# Altium PCB Chemist.PcbDoc
Units mm, origin at the board's own origin, x right, y up, seen from the top; angles counter-clockwise.
Board outline 166 x 80 mm, 2 copper layers (Top Layer, Bottom Layer), stack 1.448 mm thick; 25 components, 24 nets, 95 pads, 44 vias.
Unrouted connection lines stored in the file: 12.
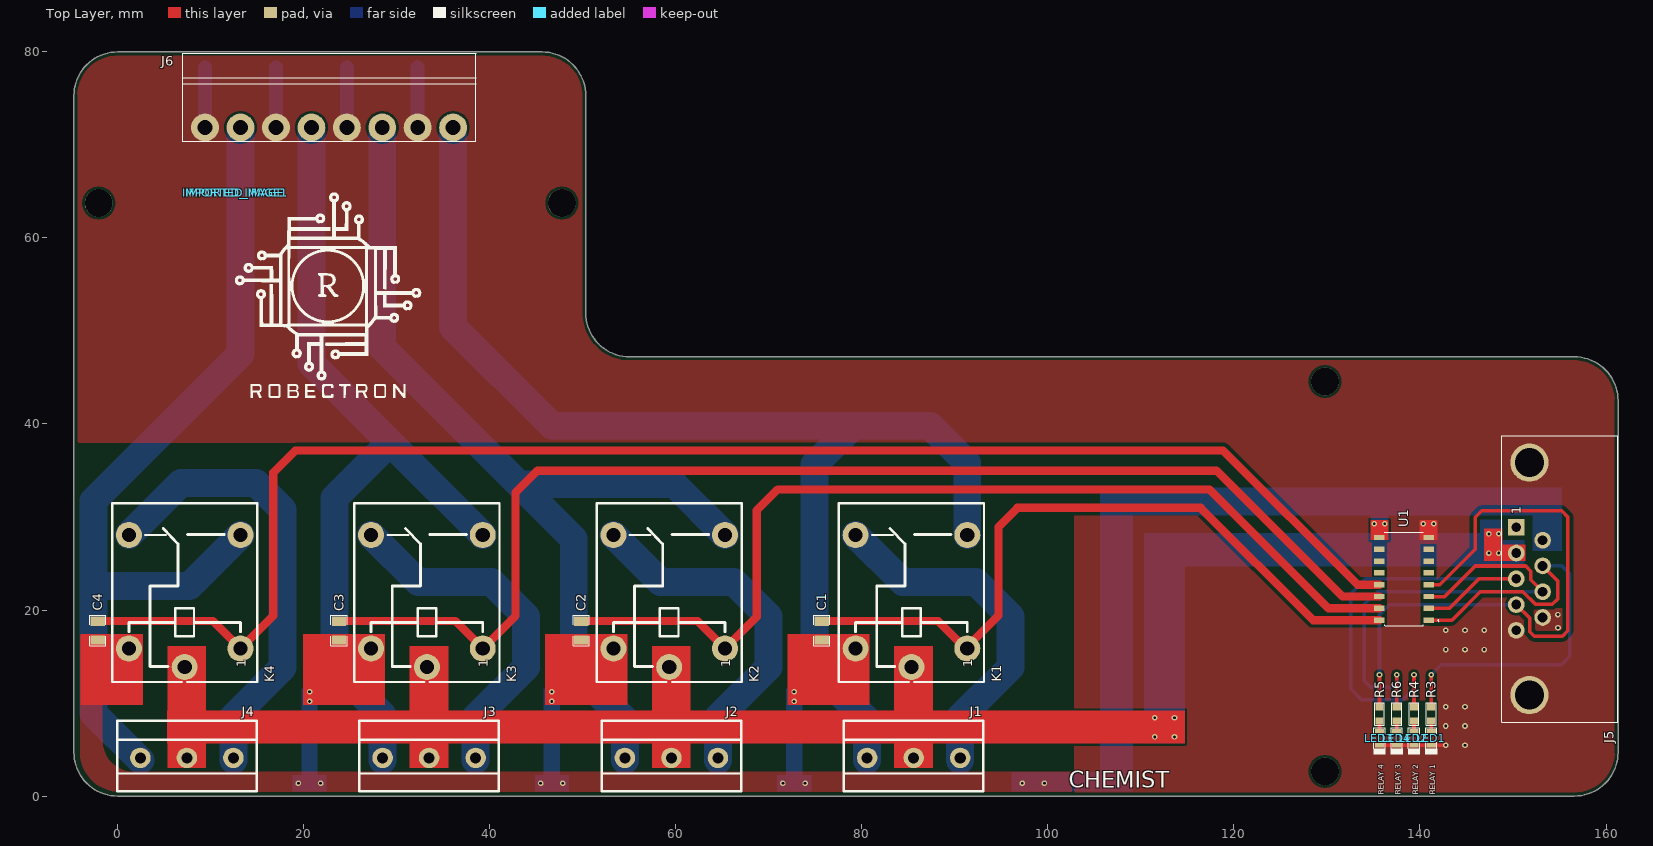
[diagram p0: Top Layer view]
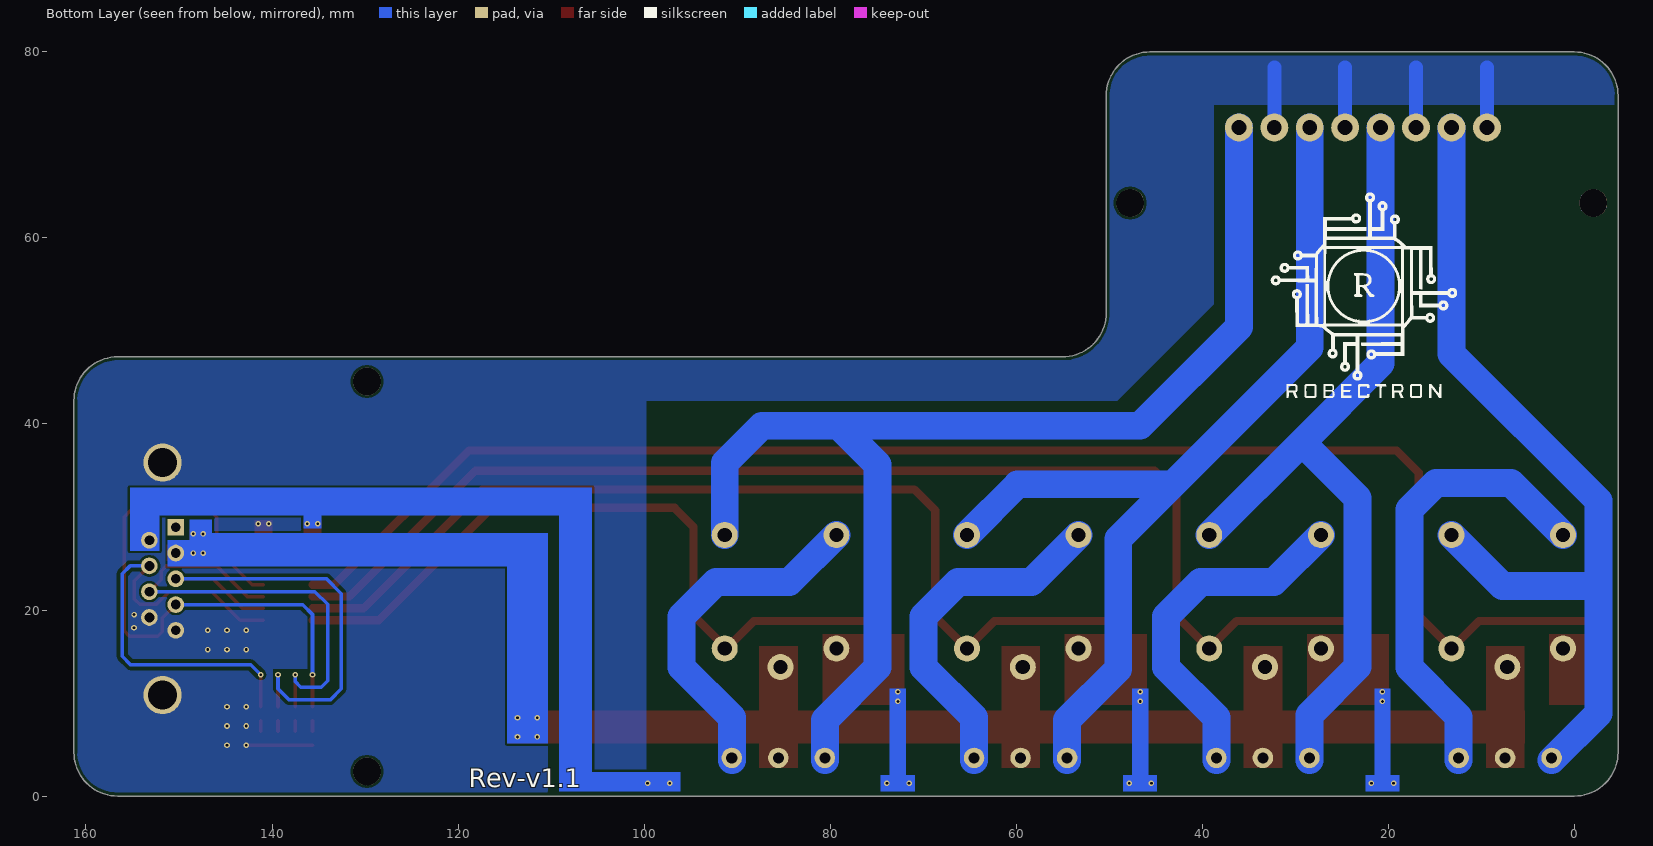
[diagram p1: Bottom Layer view, seen from below]
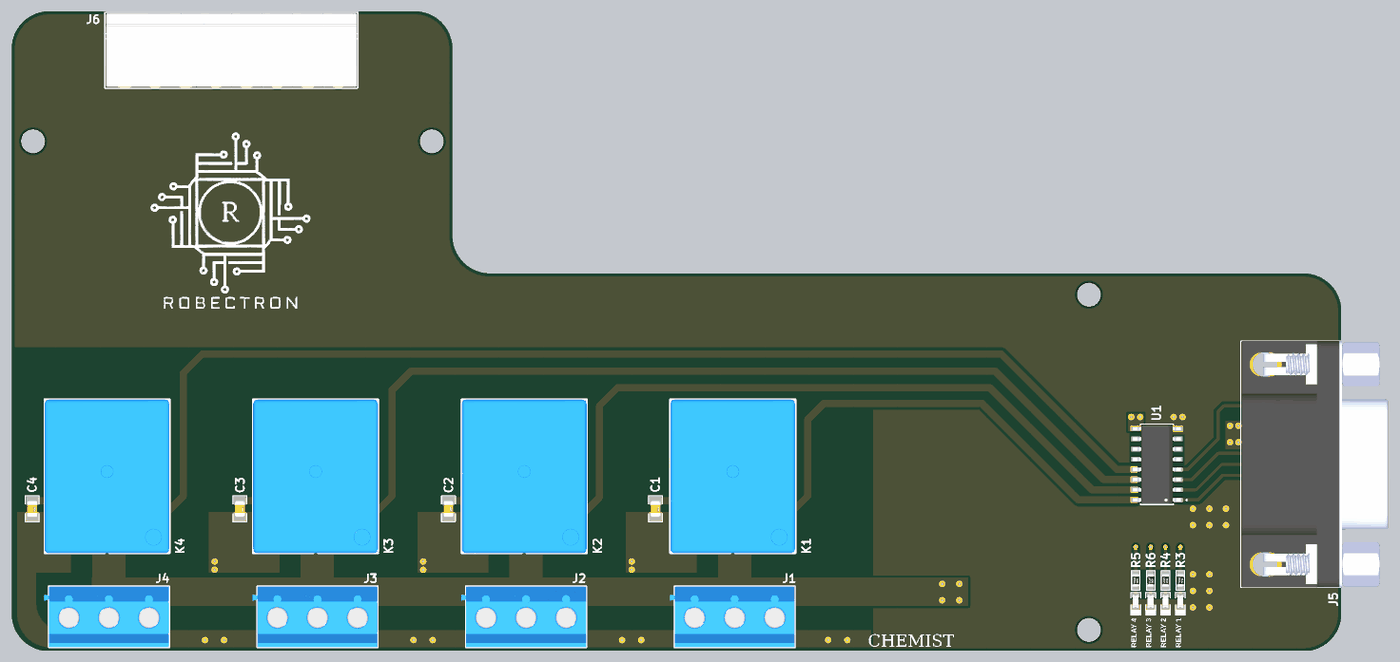
[diagram p2: 3D render of the assembled board from above, using the file's embedded part models]

## Layer stack, top to bottom
Top Solder: solder mask 0.0762, Solder Resist, Dk 3.5
Top Layer: signal copper 0.254
Dielectric 1: core 0.9398, FR-4, Dk 4.8
Bottom Layer: signal copper 0.254
Bottom Solder: solder mask 0.0762, Solder Resist, Dk 3.5

## Board outline
-4.7,4.712 -4.7,75.288 cw(c0.006,75.294) 0,80 45.628,80 cw(c45.622,75.294) 50.328,75.288 50.328,51.934 ccw(c55.034,51.928) 55.028,47.222 156.594,47.222 156.6,47.222 cw(c156.594,42.516) 161.3,42.51 161.3,4.712 cw(c156.594,4.706) 156.6,0 0,0 cw(c0.006,4.706)

## Design rules (kind name [scope] priority, off if disabled: settings)
BoardOutlineClearance [All] p1: gap=0 ignorepadtopadclearanceinfootprint=FALSE except(0.381: Poly-OutlineEdge)
Clearance [All] p1: gap=0.254 ignorepadtopadclearanceinfootprint=FALSE except(0: Arc-Hole Track-Hole SMDPad-Hole THPad-Hole Via-Hole Fill-Hole Poly-Hole Region-Hole Text-Hole; 0.381: Track-Poly)
HoleSize [All] p1: absolutevalues=TRUE maxlimit=3.1 minlimit=0.025 maxpercent=80.000 minpercent=20.000
MinimumSolderMaskSliver [All] p1: minsoldermaskwidth=0
PolygonConnect [All] p1: connectstyle=Direct reliefconductorwidth=0.254 reliefentries=4 polygonreliefangle="45 Angle" airgapwidth=0.254
RoutingVias [All] p1: holewidth=0.3 width=0.6 viastyle="Through Hole" minholewidth=0.3 minwidth=0.6 maxholewidth=0.3 maxwidth=0.6
SilkToSilkClearance [All] p1: silktosilkclearance=0
SilkToSolderMaskClearance [IsPad] p1: minsilkscreentomaskgap=0 clearancetoexposedcopper=TRUE
SolderMaskExpansion [All] p1: expansion=0.102 istentingtop=FALSE
UnRoutedNet [All] p1: checkbadconnections=TRUE
Width [All] p1: maxlimit=3 minlimit=0.254 preferedwidth=0.305 minimp=50.000000 maximp=50.000000 favimp=50.000000
25 further rules are at their usual default settings.

## Classes and differential pairs
component class Chemist-Sheet-v1.1: C1 C2 C3 C4 J1 J2 J3 J4 J5 J6 K1 K2 K3 K4 LED1 LED2 LED3 LED4 R3 R4 R5 R6 U1

## Components (designator, comment, footprint, x,y, rotation, side; value= is the part's Value field where it differs from the comment)
C1 "10uF" Cap-0805 75.693,17.795 r270 top locked
C2 "10uF" Cap-0805 49.836,17.795 r270 top locked
C3 "10uF" Cap-0805 23.801,17.795 r270 top locked
C4 "10uF" Cap-0805 -2.132,17.795 r270 top locked
IMPORTED_IMAGE "Comment" IMPORTED_IMAGE 12.625,64.861 r0 top
IMPORTED_IMAGE1 "Comment" IMPORTED_IMAGE 12.625,64.861 r0 top (schematic designator IMPORTED_IMAGE)
J1 "XY301V-A-5.0-3P" XY301V-A-5.0-3P 85.573,4.104 r180 top locked
J2 "XY301V-A-5.0-3P" XY301V-A-5.0-3P 59.531,4.104 r180 top locked
J3 "XY301V-A-5.0-3P" XY301V-A-5.0-3P 33.488,4.104 r180 top locked
J4 "XY301V-A-5.0-3P" XY301V-A-5.0-3P 7.446,4.104 r180 top locked
J5 "A-DF 09 A/KG-T2S" "A-DF 09 A/KG-T2S" 151.766,23.357 r90 top locked
J6 "DB2ERC-3.81-8P-GN" DB2ERC-3.81-8P-GN 22.734,71.871 r180 top locked
K1 "SRD-05VDC-SL-C" SRD-05VDC-SL-C 85.337,20.967 r90 top locked
K2 "SRD-05VDC-SL-C" SRD-05VDC-SL-C 59.294,20.967 r90 top locked
K3 "SRD-05VDC-SL-C" SRD-05VDC-SL-C 33.252,20.967 r90 top locked
K4 "SRD-05VDC-SL-C" SRD-05VDC-SL-C 7.21,20.967 r90 top locked
LED1 "LTST-C193KRKT-5A" LED-0603 141.212,6.224 r270 top locked
LED2 "LTST-C193KRKT-5A" LED-0603 139.357,6.224 r270 top locked
LED3 "LTST-C193KRKT-5A" LED-0603 135.649,6.224 r270 top locked
LED4 "LTST-C193KRKT-5A" LED-0603 137.503,6.224 r270 top locked
R3 "220R" Res-0603 141.212,8.84 r90 top locked
R4 "220R" Res-0603 139.357,8.84 r90 top locked
R5 "220R" Res-0603 135.649,8.84 r90 top locked
R6 "220R" Res-0603 137.503,8.84 r90 top locked
U1 "ULN2003AIDR" "16-SOIC (0.154\", 3.90mm Width)" 138.283,23.357 r180 top locked

## Footprints (in the part's own frame and the unit in brackets; to place one, negate y for a bottom-side part, rotate by r counter-clockwise, add the part's x,y. Pads: shape width x height; smd on the part's side, far side on the other; paste and mask are expansions set on the pad)
"16-SOIC (0.154\", 3.90mm Width)" [mm]
  rect 1.12x0.58 smd: 1(-2.64,4.445) 2(-2.64,3.175) 3(-2.64,1.905) 4(-2.64,0.635) 5(-2.64,-0.635) 6(-2.64,-1.905) 7(-2.64,-3.175) 8(-2.64,-4.445) 9(2.64,-4.445) 10(2.64,-3.175) 11(2.64,-1.905) 12(2.64,-0.635) 13(2.64,0.635) 14(2.64,1.905) 15(2.64,3.175) 16(2.64,4.445)
  silkscreen extent -3.74,-5.03 2.06,5.03, body extent -3,-4.95 3,4.95, height 1.75
"A-DF 09 A/KG-T2S" [mm]
  rect 1.8x1.8 / inner round 1.8 / far side rect 1.8x1.8 hole 1.05: 1(5.54,1.42)
  round 1.8 hole 1.05: 2(2.77,1.42) 3(0,1.42) 4(-2.77,1.42) 5(-5.54,1.42) 6(4.155,-1.42) 7(1.385,-1.42) 8(-1.385,-1.42) 9(-4.155,-1.42)
  round 4.116 hole 3.1: S1(-12.495,0) S2(12.495,0)
  silkscreen extent -15.41,-9.5 15.41,3, body extent -15.41,-15.4 15.41,2.9, height 12.8
Cap-0805 [mil] "SMD 0805"
  rect 40x60 smd mask+2.76: 1(-40,0) 2(40,0)
  silkscreen extent -64,-34 64,34, body extent -39,-25 39,25, height 30
DB2ERC-3.81-8P-GN [mm]
  round 3 hole 1.6 paste+0 mask+0.051: 1(-13.335,0) 2(-9.525,0) 3(-5.715,0) 4(-1.905,0) 5(1.905,0) 6(5.715,0) 7(9.525,0) 8(13.335,0)
  silkscreen extent -15.8,-8 15.8,1.5, body extent -15.64,-7.89 15.64,1.31, height 7.2
IMPORTED_IMAGE [mm]
  silkscreen extent 0,-22.05 19.99,0.01
LED-0603 [mm]
  rect 0.5x1 smd: 1(-0.75,0) 2(0.75,0)
  silkscreen extent -1.12,-0.66 1.75,0.66, body extent -0.82,-0.37 0.82,0.36, height 0.68
Res-0603 [mil]
  rect 30x35 smd: 1(-30,0) 2(30,0)
  silkscreen extent -48,-21 48,21, body extent -31,-17 31,17, height 18
SRD-05VDC-SL-C [mil]
  round 110 hole 60 paste+0 mask+2: 1(-200.79,-236.22) 2(279.53,-236.2) 3(279.53,236.2) 4(-200.79,236.22) 5(-279.53,0)
  silkscreen extent -342,-307 413,307, body extent -343,-307 413,307, height 642
XY301V-A-5.0-3P [mm]
  round 2.2 hole 1.2 paste+0 mask+0.051: 1(-5,0) 2(0,0) 3(5,0)
  silkscreen extent -7.5,-4 7.5,3.6, body extent -7.5,-4 8.1,3.6, height 10.3

## Part data
C1 C2 C3 C4: library part GRM21BR61H106ME43L, "CAP CER 10UF 50V X5R 0805", LCSC Part Number=C2190942, Manufacturer=Murata, Supplier Part Number 1=490-18664-1-ND, Category="Ceramic Capacitors", Manufacturer Part Number=GRM21BR61H106ME43L, Pricing 1="1=0.44000, 10=0.30700, 50=0.21500, 100=0.18420, 500=0.13818, 1000=0.11668 (USD)", RoHS=Yes, Stock 1=26, Supplier 1=Digi-Key
J1 J2 J3 J4: "1x3P 15A 300V Blue 14~22 Straight 5mm 1.5 1 3 Plugin,P=5mm Screw terminal ROHS", LCSC Part Number=C557652, Manufacturer="Ningbo Xinlaiya Elec", Package=Plugin,P=5mm, ComponentLink1Description=LCSC, ComponentLink1URL=https://www.lcsc.com/product-detail/Screw-terminal_Ningbo-Xinlaiya-Elec-XY301V-A-5-0-3P_C557652.html, Item Type="Screw terminal", Manufacturer Part Number=XY301V-A-5.0-3P
J5: "CONN D-SUB RCPT 9POS R/A SLDR", Manufacturer=Assmann, Supplier Part Number=AE10921-ND, ComponentLink1Description=https://datasheet.ciiva.com/26927/getdatasheetpartid-755627-26927441.pdf?src-supplier=Verical, ComponentLink1URL=https://datasheet.ciiva.com/26927/getdatasheetpartid-755627-26927441.pdf?src-supplier=Verical, Height=12.68mm, Item Type="D-Sub Connectors", Lead Free=5697LeadFree, Manufacturer Part Number="A-DF 09 A/KG-T2S", Number of Contacts=9NUMBER, Pricing="1=0.78, 10=0.661, 25=0.6336, 40=0.62025, 90=0.59322, 270=0.53933, 450=0.4854, 990=0.43147, 2430=0.39102 (USD)", RoHS=Yes, Stock=23990, Supplier=Digikey
J6: "250V 10A 8 Bend -40℃~+105℃ 1 3.81mm 1x8P Green Board Edge/Receptacle-Close Push-Pull,P=3.81mm Pluggable System Terminal Block ROHS", LCSC Part Number=C395716, Manufacturer=DORABO, Package=Push-Pull,P=3.81mm, ComponentLink1Description=LCSC, ComponentLink1URL=https://www.lcsc.com/product-detail/Pluggable-System-Terminal-Block_DORABO-DB2ERC-3-81-8P-GN_C395716.html, Item Type="Terminal Block", Manufacturer Part Number=DB2ERC-3.81-8P-GN
K1 K2 K3 K4: "250V@AC 5V 15A SPDT (1 Form C) Plugin,15.6x19.2mm Power Relays ROHS", LCSC Part Number=C35449, Manufacturer="Ningbo Songle Relay", Package=Plugin,15.6x19.2mm, ComponentLink1Description=LCSC, ComponentLink1URL=https://www.lcsc.com/product-detail/Power-Relays_Ningbo-Songle-Relay-SRD-05VDC-SL-C_C35449.html, Item Type=Relays, Manufacturer Part Number=SRD-05VDC-SL-C
LED1 LED2 LED3 LED4: "LED RED CLEAR CHIP SMD", Case Code (Imperial)=0603, Case Code (Metric)=1608, Color=Red, Forward Current=30mA, Forward Voltage=2.3V, Lens Color=Colorless, Manufacturer="Vishay Lite-On", Max Operating Temperature=85°C, Min Operating Temperature=-55°C, Package Quantity=3000, Power Dissipation=75mW, Reverse Voltage=5V, Supplier Part Number=160-1830-1-ND, Test Current=5mA, Case/Package=0603, ComponentLink1Description=https://datasheet.ciiva.com/11775/0900766b80dc0551-11775612.pdf?src-supplier=Rs, ComponentLink1URL=https://datasheet.ciiva.com/11775/0900766b80dc0551-11775612.pdf?src-supplier=Rs, ComponentLink2Description=https://datasheet.ciiva.com/4689/100-ltst-c193krkt-5a-61179-4689123.pdf?src-supplier=Mouser, ComponentLink2URL=https://datasheet.ciiva.com/4689/100-ltst-c193krkt-5a-61179-4689123.pdf?src-supplier=Mouser, ComponentLink3Description=https://datasheet.ciiva.com/16210/ltst-c193krkt-5a-16210822.pdf?src-supplier=Future+Electronics, ComponentLink3URL=https://datasheet.ciiva.com/16210/ltst-c193krkt-5a-16210822.pdf?src-supplier=Future+Electronics, ComponentLink4Description=https://datasheet.ciiva.com/2110/s-110-ltst-c193krkt-5a-2110272.pdf?src-supplier=Digikey, ComponentLink4URL=https://datasheet.ciiva.com/2110/s-110-ltst-c193krkt-5a-2110272.pdf?src-supplier=Digikey, Depth=0.8mm, Dominant Wavelength=631nm, Height=0.45mm, Illumination Color=Red, Item Type=LEDs, Lead Free="Lead Free", Length=1.6mm, Lens Size=0.8mm, Lens Style=Flat,Diffused,Colorless,Rectangular,Clear, Lens Transparency=Clear, Luminous Intensity=45mcd, Manufacturer Part Number=LTST-C193KRKT-5A, Mounting Technology="Surface Mount", Number of Elements=1, Number of LEDs=1, Packaging="Tape and Reel", Pins=2, Pricing="1=0.39, 10=0.211, 100=0.0981, 500=0.0906, 1000=0.07097, 2000=0.06946 (USD)", Radiation Hardening=No, RoHS=Yes, RoHS Compliant=Yes, Series=-, Stock=241564, Supplier=Digikey, Viewing Angle=130°, Wavelength=631nm, Width=0.8mm
R3 R4 R5 R6: library part CRCW0603220RFKEA, "RES SMD 220 OHM 1% 1/10W 0603", Case Code (Imperial)=0603, Case Code (Metric)=1608, LCSC Part Number=C844757, Max Operating Temperature=155°C, Max Power Dissipation=100mW, Min Operating Temperature=-55°C, Package Quantity=5000, Ratings=AEC-Q200, Resistance Tolerance=1%, Resistor Type="Thick Film", Supplier Part Number=71-CRCW0603-220-E3, Temperature Coefficient=100ppm/°C, Voltage Rating=75V, Case/Package=0603, Category="Chip SMD Resistors", ComponentLink1Description=LCSC, ComponentLink2Description=https://datasheet.ciiva.com/11810/0900766b80d98afc-11810631.pdf?src-supplier=Rs, ComponentLink2URL=https://datasheet.ciiva.com/11810/0900766b80d98afc-11810631.pdf?src-supplier=Rs, ComponentLink3Description=https://datasheet.ciiva.com/8339/dcrcwe3-8339957.pdf?src-supplier=Avnet, ComponentLink3URL=https://datasheet.ciiva.com/8339/dcrcwe3-8339957.pdf?src-supplier=Avnet, ComponentLink4Description=https://datasheet.ciiva.com/16222/dcrcwe3-16222278.pdf?src-supplier=Future+Electronics, ComponentLink4URL=https://datasheet.ciiva.com/16222/dcrcwe3-16222278.pdf?src-supplier=Future+Electronics, ComponentLink5Description=https://datasheet.ciiva.com/7777/1697337-7777301.pdf?src-supplier=Element14, ComponentLink5URL=https://datasheet.ciiva.com/7777/1697337-7777301.pdf?src-supplier=Element14, ComponentLink6Description=https://datasheet.ciiva.com/16763/70201119-16763287.pdf?src-supplier=Allied+Electronics, ComponentLink6URL=https://datasheet.ciiva.com/16763/70201119-16763287.pdf?src-supplier=Allied+Electronics, ComponentLink7Description=https://datasheet.ciiva.com/2466/dcrcwe3-2466464.pdf?src-supplier=Digi-Key, ComponentLink7URL=https://datasheet.ciiva.com/2466/dcrcwe3-2466464.pdf?src-supplier=Digi-Key, ComponentLink8Description=https://datasheet.ciiva.com/2466/dcrcwe3-2466465.pdf?src-supplier=Digi-Key, ComponentLink8URL=https://datasheet.ciiva.com/2466/dcrcwe3-2466465.pdf?src-supplier=Digi-Key, ComponentLink9Description=https://datasheet.ciiva.com/2466/dcrcwe3-2466466.pdf?src-supplier=Digi-Key, ComponentLink9URL=https://datasheet.ciiva.com/2466/dcrcwe3-2466466.pdf?src-supplier=Digi-Key, ComponentLink10Description=https://datasheet.ciiva.com/7777/1720486-7777551.pdf?src-supplier=Element14, ComponentLink10URL=https://datasheet.ciiva.com/7777/1720486-7777551.pdf?src-supplier=Element14, ComponentLink11Description=https://datasheet.ciiva.com/26316/fld-crcw-e3-data-en-26316574.pdf?src-supplier=Distrelec, ComponentLink11URL=https://datasheet.ciiva.com/26316/fld-crcw-e3-data-en-26316574.pdf?src-supplier=Distrelec, ComponentLink12Description=https://datasheet.ciiva.com/5550/dcrcwe3-109170-5550773.pdf?src-supplier=Mouser, ComponentLink12URL=https://datasheet.ciiva.com/5550/dcrcwe3-109170-5550773.pdf?src-supplier=Mouser, ComponentLink13Description=https://datasheet.ciiva.com/15159/getdatasheetpartid-45816-15159565.pdf?src-supplier=Verical, ComponentLink13URL=https://datasheet.ciiva.com/15159/getdatasheetpartid-45816-15159565.pdf?src-supplier=Verical, Construction=Rectangular, Contact Plating=Tin, Depth=0.85mm, Features="Automotive AEC-Q200", Height=0.45mm, Item Type=Resistor, Lead Free="Lead Free", Length=1.55mm, Military Standard=Not, Number of Terminations=2, Packaging="Tape and Reel", Power Rating=100mW, Pricing="1=0.1, 10=0.017, 50=0.017, 100=0.01, 1000=0.008, 10000=0.004 (USD)", Radiation Hardening=No, Reach SVHC Compliant=Unknown, RoHS=Yes, RoHS Compliant=Yes, Series=CRCW, Stock=40706, Supplier=Mouser, Technology="THICK FILM", Termination=SMD/SMT, Tolerance=1%, Voltage Rating (DC)=75V, Weight=7.1E-05oz, Width=0.85mm
U1: "IC PWR RELAY 7NPN 1:1 16SOIC", Manufacturer="Texas Instruments", Supplier Part Number=595-ULN2003AIDR, ComponentLink1Description=https://datasheet.ciiva.com/15139/getdatasheetpartid-47948-15139878.pdf?src-supplier=Verical, ComponentLink1URL=https://datasheet.ciiva.com/15139/getdatasheetpartid-47948-15139878.pdf?src-supplier=Verical, ComponentLink2Description=https://datasheet.ciiva.com/14424/ulq2003a-14424030.pdf?src-supplier=Avnet, ComponentLink2URL=https://datasheet.ciiva.com/14424/ulq2003a-14424030.pdf?src-supplier=Avnet, ComponentLink3Description=https://datasheet.ciiva.com/1700/uln2003ai-1700820.pdf?src-supplier=Digikey, ComponentLink3URL=https://datasheet.ciiva.com/1700/uln2003ai-1700820.pdf?src-supplier=Digikey, ComponentLink4Description=https://datasheet.ciiva.com/1700/uln2003ai-1700821.pdf?src-supplier=Digikey, ComponentLink4URL=https://datasheet.ciiva.com/1700/uln2003ai-1700821.pdf?src-supplier=Digikey, ComponentLink5Description=https://datasheet.ciiva.com/1700/uln2003ai-1700822.pdf?src-supplier=Digikey, ComponentLink5URL=https://datasheet.ciiva.com/1700/uln2003ai-1700822.pdf?src-supplier=Digikey, Item Type=IC, Manufacturer Part Number=ULN2003AIDR, Pricing="1=0.66, 10=0.589, 50=0.589, 100=0.402, 1000=0.285, 10000=0.232 (USD)", RoHS=Yes, Stock=2012, Supplier=Mouser

## Free pads (board coordinates)
  round 3 hole 3 unplated paste+0: ""(-2.031,63.743) ""(47.753,63.743) ""(129.795,2.656) ""(129.795,44.566)

## Via types
v1: diameter 0.6, hole 0.3, Top Layer to Bottom Layer, 44 vias

## Nets (pads, with @x,y where several pads share a name; then routed paths per layer and width w, separated by ;. In a path a pad name is that pad's centre, name@x,y a point inside that pad or via, vN(x,y) a via of type N, cw(c..) or ccw(c..) an arc to the next point about the centre after c; other vN are vias at no path point)
5V_EXT: C1.2 C2.2 C3.2 C4.2 J5.6 K1.4 K2.4 K3.4 K4.4 U1.9
  other v1: 19.432,1.386 21.82,1.386 45.474,1.386 47.862,1.386 71.517,1.386 73.904,1.386 97.242,1.386 99.629,1.386 20.637,10.175 46.679,10.175 72.721,10.175 20.637,11.216 46.679,11.216 72.721,11.216 135.083,29.275 136.203,29.275
12V_EXT: J1.2 J2.2 J3.2 J4.2 J5.2 K1.5 K2.5 K3.5 K4.5
  other v1: 111.482,6.365 113.615,6.365 111.482,8.422 113.615,8.422 147.416,26.119 148.464,26.127 147.416,28.183 148.464,28.191
GND: J5.5 J5.9 J5.S1 J5.S2 J6.2 J6.4 J6.6 J6.8 LED1.2 LED2.2 LED3.2 LED4.2 U1.8 | length 33.1
  Top Layer w0.381: LED3.2 LED1.2 ; LED1.2 v1(142.775,5.474)
  Bottom Layer w0.762: 32.158,78.424 32.259,78.323
  Bottom Layer w1.5: J6.8 9.399,78.323 ; J6.6 17.019,78.323 ; J6.4 24.639,78.323 ; J6.2 32.259,78.323
  other v1: 144.839,5.474 142.775,7.538 144.839,7.538 142.775,9.602 144.839,9.602 142.775,15.753 144.839,15.753 146.903,15.753 142.775,17.817 144.839,17.817 146.903,17.817 154.84,18.099 154.834,19.512 140.363,29.275 141.483,29.275
IN1: J5.7 R3.2 U1.1 | length 51.5
  Top Layer w0.381: U1.1 143.435,18.912 146.49,21.967 151.064,21.967 152.418,20.614 154.221,20.614 154.834,21.227 154.834,23.095 J5.7 ; R3.2 v1(141.212,13.045)
  Bottom Layer w0.381: v1(141.212,13.045) 142.304,14.137 155.215,14.137 156.11,15.032 156.11,23.893 155.26,24.742 J5.7
IN2: J5.3 R4.2 U1.2 | length 52.2
  Top Layer w0.381: R4.2 v1(139.357,13.045) ; U1.2 143.177,20.182 146.352,23.357 J5.3
  Bottom Layer w0.381: v1(139.357,13.045) 139.357,11.549 138.144,10.336 133.757,10.336 132.55,11.542 132.55,21.76 134.147,23.357 J5.3
IN3: J5.8 R6.2 U1.3 | length 51.4
  Top Layer w0.381: R6.2 v1(137.503,13.045) ; U1.3 142.651,21.452 145.932,24.734 151.362,24.734 151.915,24.18 151.915,23.243 J5.8
  Bottom Layer w0.381: v1(137.503,13.045) 137.503,12.321 136.899,11.716 134.715,11.716 134.029,12.402 134.029,20.611 135.39,21.972 J5.8
IN4: J5.4 R5.2 U1.4 | length 65.9
  Top Layer w0.381: R5.2 v1(135.649,13.045) ; U1.4 142.13,22.722 145.932,26.524 145.932,29.971 146.633,30.672 155.226,30.672 155.896,30.002 155.896,17.76 155.318,17.181 152.286,17.181 151.79,17.677 151.79,19.144 J5.4
  Bottom Layer w0.381: v1(135.649,13.045) 135.649,19.522 136.715,20.587 J5.4
NC1: J1.1 K1.3 | length 38
  Bottom Layer w3: K1.3 84.402,23.002 92.294,23.002 95.992,19.304 95.992,13.847 90.573,8.428 J1.1@90.573,3.85
NC2: J2.1 K2.3 | length 38
  Bottom Layer w3: K2.3 58.36,23.002 66.252,23.002 69.95,19.304 69.95,13.847 64.531,8.428 J2.1@64.531,3.85
NC3: J3.1 K3.3 | length 38
  Bottom Layer w3: K3.3 32.318,23.002 40.209,23.002 43.907,19.304 43.907,13.847 38.488,8.428 J3.1@38.488,3.85
NC4: J4.1 K4.3 | length 49.2
  Bottom Layer w3: K4.3 6.808,33.664 14.878,33.664 17.743,30.799 17.743,13.821 12.446,8.524 J4.1@12.446,3.85
NetLED1_1: LED1.1 R3.1 | length 1.1
  Top Layer w0.381: LED1.1 R3.1
NetLED2_1: LED2.1 R4.1 | length 1.1
  Top Layer w0.381: LED2.1 R4.1
NetLED3_1: LED3.1 R5.1 | length 1.1
  Top Layer w0.381: LED3.1 R5.1
NetLED4_1: LED4.1 R6.1 | length 1.1
  Top Layer w0.381: LED4.1 R6.1
NO1: J1.3 J6.1 K1.2 | length 130.5
  Bottom Layer w3: J6.1 36.069,50.434 46.689,39.814 79.103,39.814 ; J1.3@80.573,3.85 80.573,8.19 74.917,13.847 74.917,35.628 79.103,39.814 ; K1.2 91.336,35.807 87.329,39.814 79.103,39.814
NO2: J2.3 J6.3 K2.2 | length 103.2
  Bottom Layer w3: J6.3 28.449,48.232 43.163,33.518 ; J2.3@54.531,3.85 54.531,8.188 49.036,13.683 49.036,27.645 43.163,33.518 ; K2.2 59.843,33.518 43.163,33.518
NO3: J3.3 J6.5 K3.2 | length 90.2
  Bottom Layer w3: J6.5 20.829,46.489 29.296,38.022 ; J3.3@28.488,3.85 28.488,8.721 23.31,13.9 23.31,32.036 29.296,38.022 ; K3.2 29.296,38.022
NO4: J4.3 J6.7 K4.2 | length 94.7
  Bottom Layer w3: J4.3@2.446,3.85 -2.575,8.872 -2.575,22.595 ; K4.2 7.738,22.595 -2.575,22.595 ; J6.7 13.209,48.123 13.209,47.538 -2.575,31.754 -2.575,22.595
"RELAY 1": C1.1 K1.1 U1.16 | length 78
  Top Layer w0.889: C1.1 88.207,18.811 K1.1@91.151,15.867 ; K1.1@91.151,15.867 94.688,19.403 94.688,28.95 96.722,30.984 116.428,30.984 128.5,18.912 U1.16
"RELAY 2": C2.1 K2.1 U1.15 | length 106.1
  Top Layer w0.889: C2.1 62.35,18.811 K2.1 ; K2.1 68.703,19.276 68.703,30.704 70.955,32.955 117.395,32.955 130.168,20.182 U1.15
"RELAY 3": C3.1 K3.1 U1.14 | length 134.2
  Top Layer w0.889: C3.1@23.91,18.811 36.308,18.811 K3.1 42.768,19.383 42.768,32.627 45.126,34.985 118.132,34.985 131.665,21.452 U1.14
"RELAY 4": C4.1 K4.1 U1.13 | length 162.8
  Top Layer w0.889: C4.1 10.266,18.811 K4.1 16.734,19.391 16.734,34.791 19.104,37.162 118.836,37.162 133.275,22.722 U1.13
VCC_5V: J5.1
pads on no net: U1.5 U1.6 U1.7 U1.10 U1.11 U1.12

## Polygon pours and split planes (outlines as drawn)
GND on Bottom Layer "NONET_L-01_P-001" (solid, remove dead copper, pour order 2): -4.7,4.712 -4.7,75.288 cw(c0.006,75.294) 0,80 45.628,80 cw(c45.622,75.294) 50.328,75.288 50.328,51.934 ccw(c55.034,51.928) 55.028,47.222 156.594,47.222 156.6,47.222 cw(c156.594,42.516) 161.3,42.51 161.3,4.712 cw(c156.594,4.706) 156.6,0 0,0 cw(c0.006,4.706)
GND on Top Layer "NONET_L-01_P-001" (solid, remove dead copper, pour order 3): -4.7,4.712 -4.7,75.288 cw(c0.006,75.294) 0,80 45.628,80 cw(c45.622,75.294) 50.328,75.288 50.328,51.934 ccw(c55.034,51.928) 55.028,47.222 156.594,47.222 156.6,47.222 cw(c156.594,42.516) 161.3,42.51 161.3,4.712 cw(c156.594,4.706) 156.6,0 0,0 cw(c0.006,4.706)
5V_EXT on Top Layer "NONET_L-01_P-001" (solid, pour order 1): -4.012,4.448 -4.012,17.287 -1.624,17.287 -1.624,6.418 ccw(c6.694,6.242) -1.587,5.437 ccw(c1.724,5.957) 1.785,2.605 102.592,2.605 102.592,0.48 0.203,0.48 cw(c0.203,4.703)

## Other copper
Top Layer:
  rectangle net 12V_EXT: 5.339,3.004 9.51,16.144
  rectangle net 12V_EXT: 31.381,3.004 35.553,16.144
  rectangle net 12V_EXT: 57.423,3.004 61.595,16.144
  rectangle net 5V_EXT: 134.675,27.512 136.631,29.682
  rectangle net GND: 139.955,27.512 141.911,29.682
  rectangle net 5V_EXT: -4.012,9.797 2.707,17.414
  rectangle net 5V_EXT: 19.915,9.797 28.749,17.414
  rectangle net 5V_EXT: 71.999,9.797 80.833,17.414
  rectangle net 5V_EXT: 45.957,9.797 54.791,17.414
  rectangle net 5V_EXT: 25.699,14.413 28.749,17.414
  rectangle net 5V_EXT: 77.783,14.413 80.833,17.414
  rectangle net 12V_EXT: 5.329,5.633 114.738,9.206
  rectangle net 12V_EXT: 83.466,3.004 87.637,16.144
  rectangle net 12V_EXT: 146.871,25.276 148.896,28.789
  rectangle net 12V_EXT: 146.871,25.276 151.362,27.062
  pour cut-out: 19.104,37.998 -4.266,37.998 -4.266,35.321 19.104,35.321
  pour cut-out: 102.846,2.605 102.846,30.266 100.788,30.266 100.788,2.605
  pour cut-out: 76.709,17.43 76.709,18.299 74.677,18.299 74.677,17.43
  pour cut-out: 50.852,17.43 50.852,18.299 48.82,18.299 48.82,17.43
  pour cut-out: -1.116,17.43 -1.116,18.299 -3.148,18.299 -3.148,17.43
  pour cut-out: 24.817,17.43 24.817,18.299 22.785,18.299 22.785,17.43
  pour cut-out: 134.95,6.47 141.91,6.47 141.91,10.237 134.95,10.237
  pour cut-out: 151.36,18.963 152.228,18.963 152.228,20.584 151.36,20.584
  pour cut-out: 154.086,20.173 155.574,20.173 155.574,21.794 154.086,21.794
  pour cut-out: 149.861,27.98 149.861,27.112 151.482,27.112 151.482,27.98
  pour cut-out: 149.887,30.469 149.887,29.601 151.507,29.601 151.507,30.469
  pour cut-out: 134.824,27.523 134.824,26.655 136.457,26.655 136.457,27.523
  pour cut-out: 140.109,23.702 140.109,22.834 141.73,22.834 141.73,23.702
  pour cut-out: 140.109,24.972 140.109,24.104 141.73,24.104 141.73,24.972
  pour cut-out: 140.109,26.242 140.109,25.374 141.73,25.374 141.73,26.242
  pour cut-out: 134.85,19.065 134.85,18.196 136.471,18.196 136.471,19.065
  pour cut-out: 134.829,26.242 134.829,25.374 136.45,25.374 136.45,26.242
  pour cut-out: 134.829,24.983 134.829,24.115 136.45,24.115 136.45,24.983
  pour cut-out: 135.688,23.713 135.688,22.845 136.45,22.845 136.45,23.713
  pour cut-out: 135.688,22.443 135.688,21.575 136.45,21.575 136.45,22.443
  pour cut-out: 135.713,21.173 135.713,20.305 136.475,20.305 136.475,21.173
  pour cut-out: 135.713,19.903 135.713,19.035 136.475,19.035 136.475,19.903
  pour cut-out: 140.109,19.892 140.109,19.024 140.871,19.024 140.871,19.892
  pour cut-out: 140.109,21.162 140.109,20.294 140.871,20.294 140.871,21.162
  pour cut-out: 140.109,26.242 140.109,25.374 140.871,25.374 140.871,26.242
  pour cut-out: 140.109,24.972 140.109,24.104 140.871,24.104 140.871,24.972
  pour cut-out: 140.109,23.702 140.109,22.834 140.871,22.834 140.871,23.702
  pour cut-out: 140.109,22.432 140.109,21.564 140.871,21.564 140.871,22.432
  pour cut-out: 146.385,29.784 146.385,28.915 147.147,28.915 147.147,29.784
Bottom Layer:
  rectangle net 5V_EXT: 96.065,0.485 109.166,2.605
  rectangle net 12V_EXT: 110.339,24.698 148.896,28.285
  rectangle net 12V_EXT: 110.339,5.633 114.738,28.285
  rectangle net 12V_EXT: 146.458,24.698 148.896,29.733
  rectangle net 12V_EXT: 146.458,24.698 151.246,27.512
  rectangle net 5V_EXT: 105.589,0.485 109.166,33.169
  rectangle net 5V_EXT: 19.754,0.489 21.513,11.572
  rectangle net 5V_EXT: 45.796,0.489 47.555,11.572
  rectangle net 5V_EXT: 134.675,28.74 136.628,32.273
  rectangle net 5V_EXT: 105.589,30.156 155.281,33.169
  rectangle net 5V_EXT: 152.077,26.354 155.281,33.169
  rectangle net 5V_EXT: 70.907,0.489 74.565,2.25
  rectangle net 5V_EXT: 44.865,0.489 48.522,2.25
  rectangle net 5V_EXT: 18.823,0.489 22.48,2.25
  rectangle net 5V_EXT: 71.839,0.489 73.597,11.572
  pour cut-out: 109.166,0.485 110.339,0.485 110.339,30.15 109.166,30.15
  pour cut-out: 131.967,11.542 139.94,11.542 139.94,13.665 131.967,13.665
  pour cut-out: -4.7,74.335 -4.7,4.7 0,0 99.747,0 99.747,42.51 49.149,42.51 38.762,52.897 38.762,74.335

## Silkscreen, mask and mechanical layers (free items; w line width, h text height)
Top Overlay:
  text "CHEMIST" at 102.247,0.294 h3
  text "RELAY 4" at 136.309,0.128 h1.02 r90
  text "RELAY 3" at 138.164,0.128 h1.02 r90
  text "RELAY 2" at 140.018,0.128 h1.02 r90
  text "RELAY 1" at 141.872,0.128 h1.02 r90
Bottom Overlay:
  text "Rev-v1.1" at 118.834,0.931 h2
Board Outline:
  lines w0.254: 156.594,47.222 55.028,47.222 cw(c55.034,51.928) 50.328,51.934 50.328,75.288 ccw(c45.622,75.294) 45.628,80 0,80 ccw(c0.006,75.294) -4.7,75.288 -4.7,4.712 ccw(c0.006,4.706) 0,0 156.6,0 ccw(c156.594,4.706) 161.3,4.712 161.3,42.51 ccw(c156.594,42.516) 156.6,47.222
Fabrication:
  drawing of 191 lines, arcs and shapes, not listed
  text "Layer" at 223.855,84.43 h1.52
  text "Name" at 234.267,84.43 h1.52
  text "Material" at 257.882,84.43 h1.52
  text "Thickness" at 279.721,84.43 h1.52
  text "Constant" at 296.226,84.43 h1.52
  text "Board Layer Stack" at 310.701,84.43 h1.52
  text "Top Overlay" at 234.267,81.382 h1.52
  text "Top Solder" at 234.267,78.334 h1.52
  text "Solder Resist" at 257.882,78.334 h1.52
  text "3.00mil" at 279.721,78.334 h1.52
  text "3.5" at 296.226,78.334 h1.52
  text "1" at 223.855,75.286 h1.52
  text "Top Layer" at 234.267,75.286 h1.52
  text "10.00mil" at 279.721,75.286 h1.52
  text "Dielectric 1" at 234.267,72.238 h1.52
  text "FR-4" at 257.882,72.238 h1.52
  text "37.00mil" at 279.721,72.238 h1.52
  text "4.8" at 296.226,72.238 h1.52
  text "2" at 223.855,69.19 h1.52
  text "Bottom Layer" at 234.267,69.19 h1.52
  text "10.00mil" at 279.721,69.19 h1.52
  text "Bottom Solder" at 234.267,66.142 h1.52
  text "Solder Resist" at 257.882,66.142 h1.52
  text "3.00mil" at 279.721,66.142 h1.52
  text "3.5" at 296.226,66.142 h1.52
  text "Bottom Overlay" at 234.267,63.094 h1.52
  text "Total board thickness:" at 223.855,60.046 h1.52
  text "63.00mil" at 279.721,60.046 h1.52
Drill Drawing:
  circle w0.254: c-1.511,99.881 r0.847
  lines w0.254: -2.358,95.225 -2.358,95.648 -1.935,96.071 -2.358,96.495 -2.358,96.918 -1.935,96.918 -1.511,96.495 -1.088,96.918 -0.665,96.918 -0.665,96.495 -1.088,96.071 -0.665,95.648 -0.665,95.225 -1.088,95.225 -1.511,95.648 -1.935,95.225 -2.358,95.225 ; -2.358,102.845 -0.665,102.845 -0.665,104.538 -2.358,104.538 -2.358,102.845 ; -2.358,106.655 -1.511,107.078 -0.665,106.655 -1.088,107.501 -0.665,108.348 -1.511,107.925 -2.358,108.348 -1.935,107.501 -2.358,106.655 ; -2.358,112.158 -0.665,112.158 -1.511,110.465 -2.358,112.158 ; -2.358,114.698 -1.935,114.698 -1.935,114.275 -1.088,114.275 -1.088,114.698 -0.665,114.698 -0.665,115.545 -1.088,115.545 -1.088,115.968 -1.935,115.968 -1.935,115.545 -2.358,115.545 -2.358,114.698 ; -2.358,118.508 -1.935,118.508 -1.511,118.085 -1.088,118.508 -0.665,118.508 -1.088,118.931 -0.665,119.355 -1.088,119.355 -1.511,119.778 -1.935,119.355 -2.358,119.355 -1.935,118.931 -2.358,118.508
  lines w0.381: -3.877,94.082 337.352,94.082 ; -3.877,120.752 337.352,120.752 ; 10.115,90.272 10.115,124.562 ; 23.828,90.272 23.828,124.562 ; 52.775,90.272 52.775,124.562 ; 65.625,90.272 65.625,124.562 ; 84.263,90.272 84.263,124.562 ; 122.352,90.272 122.352,124.562 ; 137.334,90.272 137.334,124.562 ; 156.277,90.272 156.277,124.562 ; 190.303,90.272 190.303,124.562 ; 211.989,90.272 211.989,124.562 ; 245.862,90.272 245.862,124.562 ; 279.736,90.272 279.736,124.562 ; 301.726,90.272 301.726,124.562 ; -3.877,90.272 337.352,90.272 337.352,124.562 -3.877,124.562 -3.877,90.272
  text "Symbol" at -1.591,121.895 h1.83
  text "Count" at 11.258,121.895 h1.83
  text "Hole Size" at 24.971,121.895 h1.83
  text "Plated" at 53.918,121.895 h1.83
  text "Hole Type" at 66.768,121.895 h1.83
  text "Drill Layer Pair" at 85.406,121.895 h1.83
  text "Via/Pad" at 123.495,121.895 h1.83
  text "Pad Shape" at 138.477,121.895 h1.83
  text "Template" at 157.42,121.895 h1.83
  text "Description" at 191.446,121.895 h1.83
  text "Hole Tolerance (+)" at 213.132,121.895 h1.83
  text "Hole Tolerance (-)" at 247.005,121.895 h1.83
  text "Hole Length" at 280.879,121.895 h1.83
  text "Routed Path Length" at 302.869,121.895 h1.83
  text "2" at 11.258,118.085 h1.52
  text "122.05mil (3.100mm)" at 24.971,118.085 h1.52
  text "PTH" at 53.918,118.085 h1.52
  text "Round" at 66.768,118.085 h1.52
  text "Top Layer - Bottom Layer" at 85.406,118.085 h1.52
  text "Pad" at 123.495,118.085 h1.52
  text "Rounded" at 138.477,118.085 h1.52
  text "c412h310" at 157.42,118.085 h1.52
  text "-" at 280.879,118.085 h1.52
  text "-" at 302.869,118.085 h1.52
  text "4" at 11.258,114.275 h1.52
  text "118.11mil (3.000mm)" at 24.971,114.275 h1.52
  text "NPTH" at 53.918,114.275 h1.52
  text "Round" at 66.768,114.275 h1.52
  text "Top Layer - Bottom Layer" at 85.406,114.275 h1.52
  text "Pad" at 123.495,114.275 h1.52
  text "Rounded" at 138.477,114.275 h1.52
  text "c300hn300p300" at 157.42,114.275 h1.52
  text "-" at 280.879,114.275 h1.52
  text "-" at 302.869,114.275 h1.52
  text "8" at 11.258,110.465 h1.52
  text "62.99mil (1.600mm)" at 24.971,110.465 h1.52
  text "PTH" at 53.918,110.465 h1.52
  text "Round" at 66.768,110.465 h1.52
  text "Top Layer - Bottom Layer" at 85.406,110.465 h1.52
  text "Pad" at 123.495,110.465 h1.52
  text "Rounded" at 138.477,110.465 h1.52
  text "c300h160m305mx305p300" at 157.42,110.465 h1.52
  text "-" at 280.879,110.465 h1.52
  text "-" at 302.869,110.465 h1.52
  text "9" at 11.258,106.655 h1.52
  text "41.34mil (1.050mm)" at 24.971,106.655 h1.52
  text "PTH" at 53.918,106.655 h1.52
  text "Round" at 66.768,106.655 h1.52
  text "Top Layer - Bottom Layer" at 85.406,106.655 h1.52
  text "Pad" at 123.495,106.655 h1.52
  text "Rounded" at 138.477,106.655 h1.52
  text "(Mixed)" at 157.42,106.655 h1.52
  text "-" at 280.879,106.655 h1.52
  text "-" at 302.869,106.655 h1.52
  text "12" at 11.258,102.845 h1.52
  text "47.24mil (1.200mm)" at 24.971,102.845 h1.52
  text "PTH" at 53.918,102.845 h1.52
  text "Round" at 66.768,102.845 h1.52
  text "Top Layer - Bottom Layer" at 85.406,102.845 h1.52
  text "Pad" at 123.495,102.845 h1.52
  text "Rounded" at 138.477,102.845 h1.52
  text "c220h120m225mx225p220" at 157.42,102.845 h1.52
  text "-" at 280.879,102.845 h1.52
  text "-" at 302.869,102.845 h1.52
  text "20" at 11.258,99.035 h1.52
  text "60.00mil (1.524mm)" at 24.971,99.035 h1.52
  text "PTH" at 53.918,99.035 h1.52
  text "Round" at 66.768,99.035 h1.52
  text "Top Layer - Bottom Layer" at 85.406,99.035 h1.52
  text "Pad" at 123.495,99.035 h1.52
  text "Rounded" at 138.477,99.035 h1.52
  text "(Mixed)" at 157.42,99.035 h1.52
  text "-" at 280.879,99.035 h1.52
  text "-" at 302.869,99.035 h1.52
  text "44" at 11.258,95.225 h1.52
  text "11.81mil (0.300mm)" at 24.971,95.225 h1.52
  text "PTH" at 53.918,95.225 h1.52
  text "Round" at 66.768,95.225 h1.52
  text "Top Layer - Bottom Layer" at 85.406,95.225 h1.52
  text "Via" at 123.495,95.225 h1.52
  text "Rounded" at 138.477,95.225 h1.52
  text "v60h30" at 157.42,95.225 h1.52
  text "-" at 280.879,95.225 h1.52
  text "-" at 302.869,95.225 h1.52
  text "99 Total" at 11.258,91.415 h1.52

## Dimensions
50.328,75.288 to 161.3,42.51 on Dimensions
156.594,47.222 to 156.6,0 on Dimensions
45.628,80 to 55.028,47.222 on Dimensions
0,80 to 0,0 on Dimensions
-4.7,75.288 to 50.328,75.288 on Dimensions

## Text inside footprints (layer, text, board x,y; h text height)
J5: Top Overlay "1" at 150.855,30.314 h1 r90
K1: Top Overlay "1" at 91.895,13.835 h1 r90
K2: Top Overlay "1" at 65.853,13.835 h1 r90
K3: Top Overlay "1" at 39.811,13.835 h1 r90
K4: Top Overlay "1" at 13.768,13.835 h1 r90